# Altium PCB Thunderscope_Rev5.3.PcbDoc (part 8 of 14)
Units mil, origin at the board's own origin, x right, y up, seen from the top; angles counter-clockwise.
Board outline 3937.01 x 3838.58 mil, 6 copper layers (F.Cu, In1.Cu (GND), In2.Cu (Sign), In3.Cu (Sign), In4.Cu (GND), B.Cu), stack 60.556 mil thick; 911 components, 486 nets, 2834 pads, 2761 vias.
Unrouted connection lines stored in the file: 618.
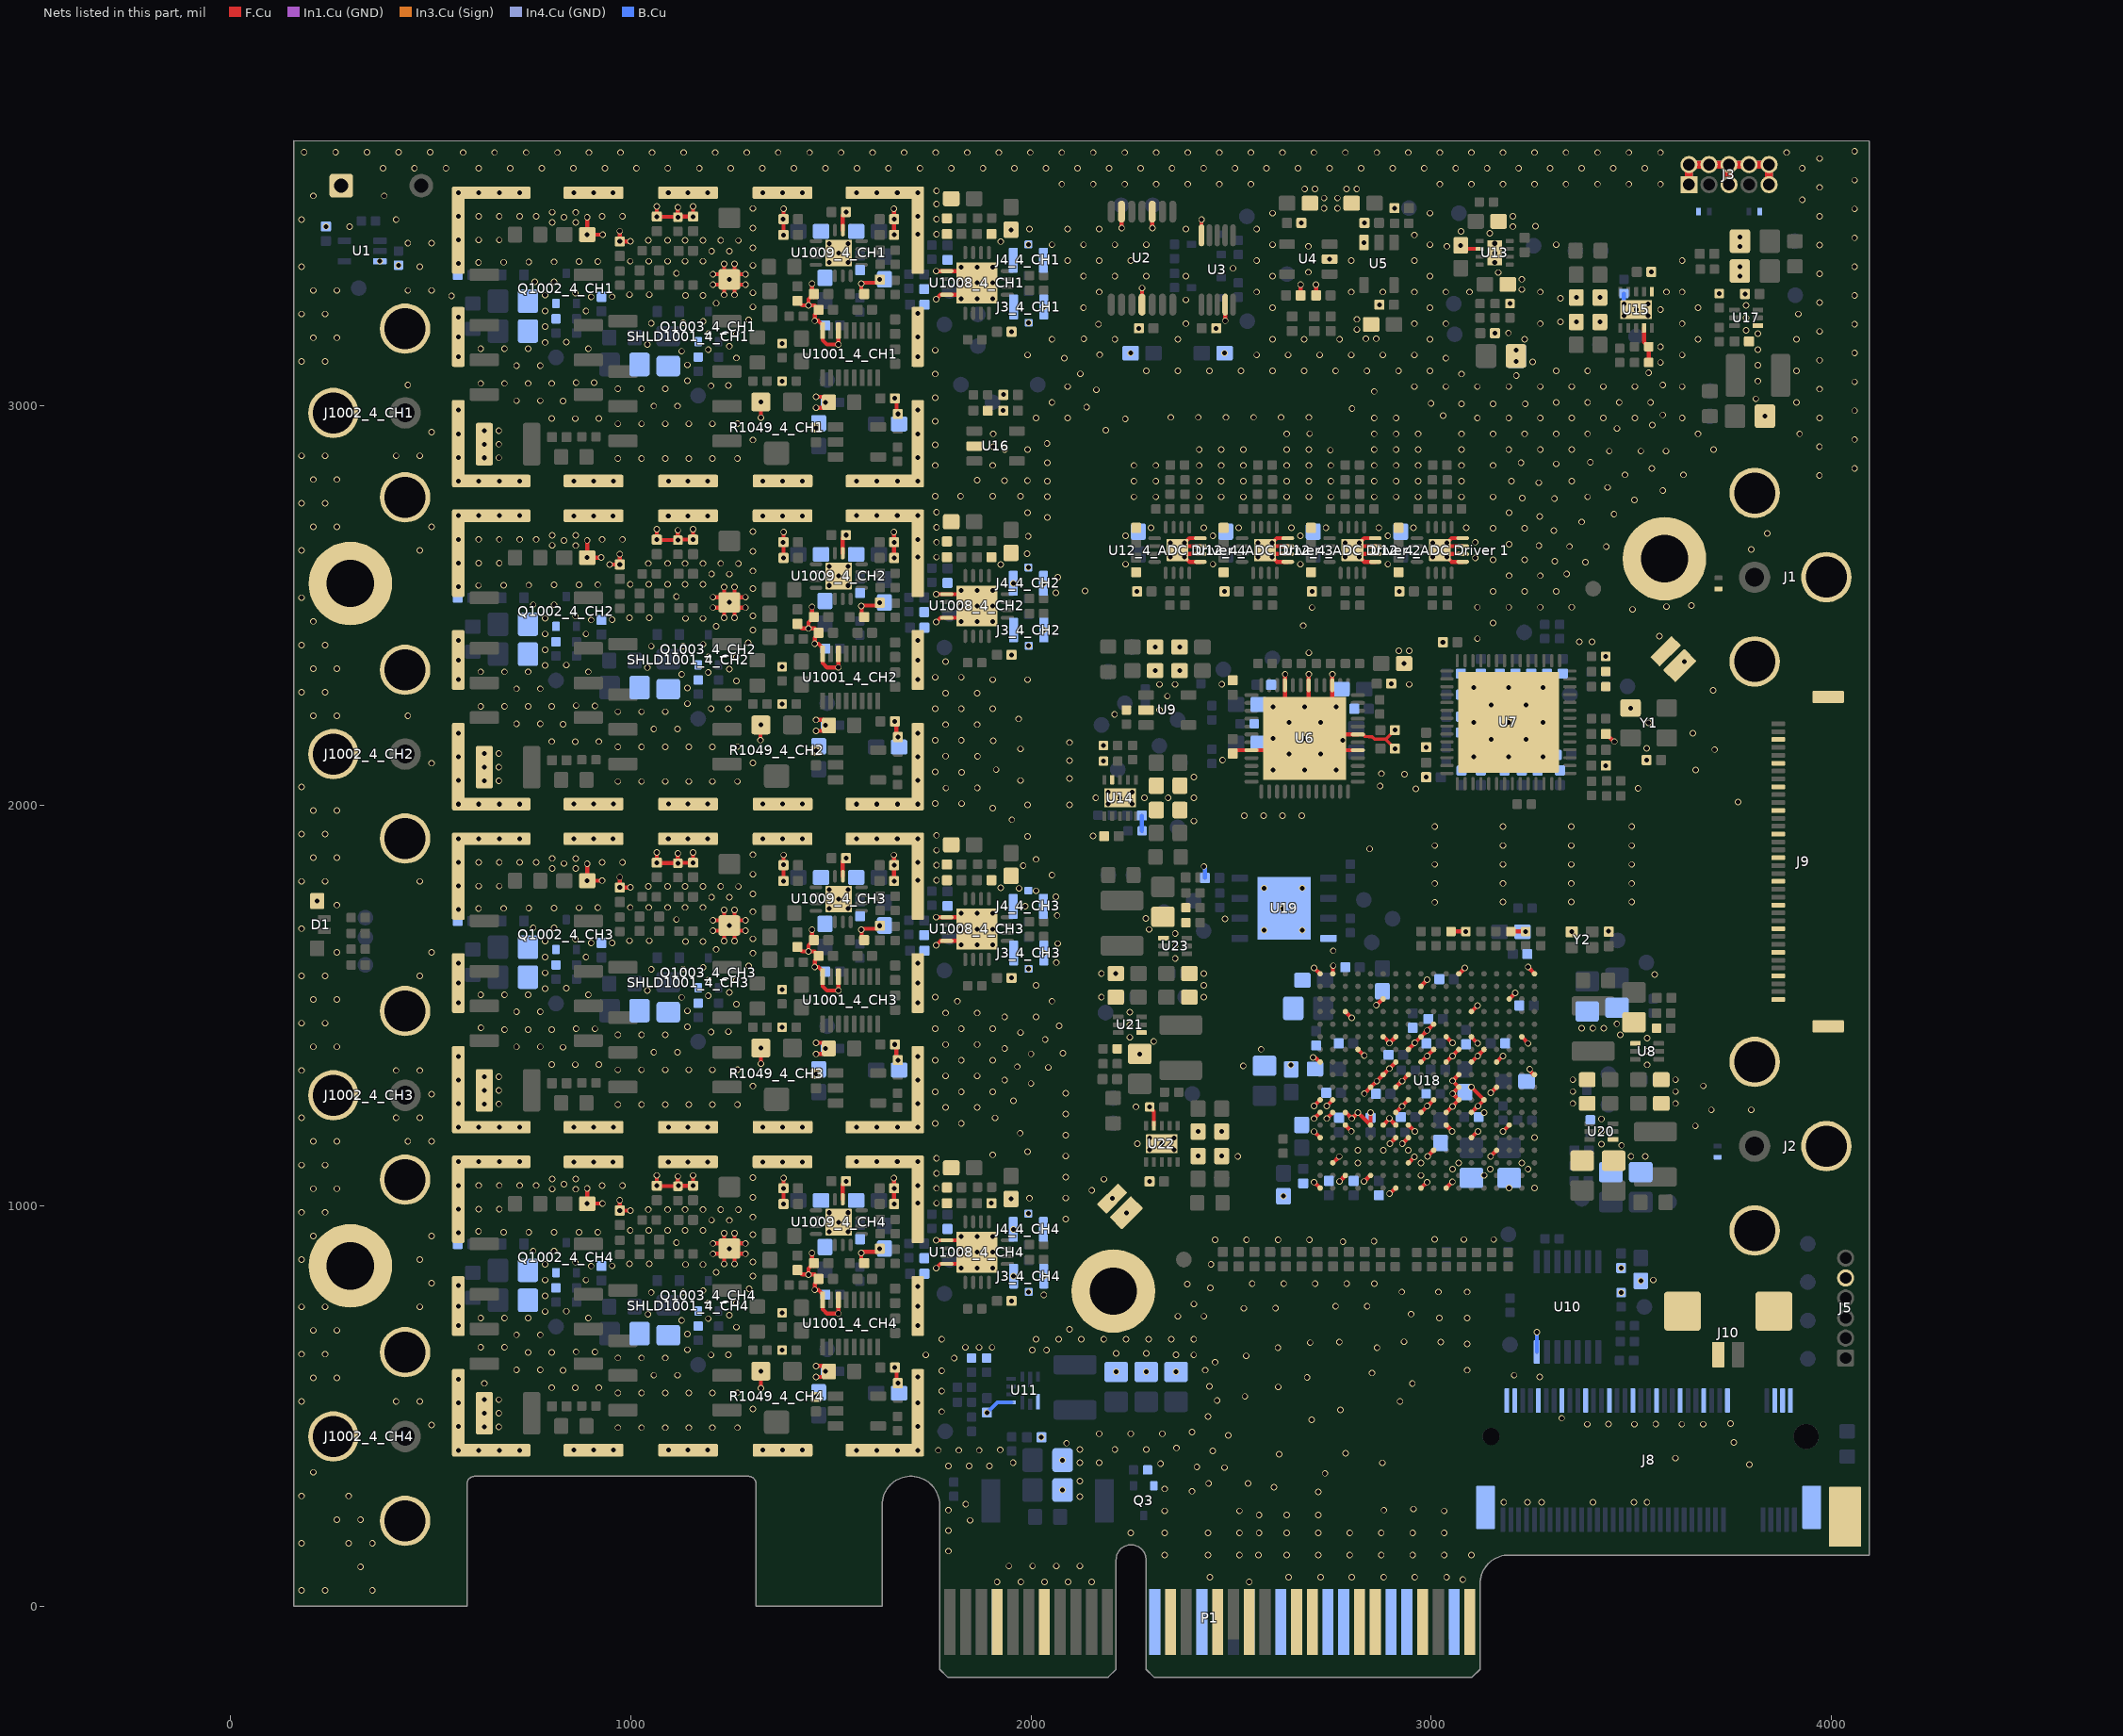
[diagram p11: the nets of this part, all layers, seen from the top]

## Via types
v1: diameter 16, hole 11.81, F.Cu to B.Cu, tented both sides, 2761 vias

## Nets (pads, with @x,y where several pads share a name; then routed paths per layer and width w, separated by ;. In a path a pad name is that pad's centre, name@x,y a point inside that pad or via, vN(x,y) a via of type N, cw(c..) or ccw(c..) an arc to the next point about the centre after c; other vN are vias at no path point) (continued)
GND: "C69_4_ADC Driver 1.1" "C69_4_ADC Driver 2.1" "C69_4_ADC Driver 3.1" "C69_4_ADC Driver 4.1" "C70_4_ADC Driver 1.2" "C70_4_ADC Driver 2.2" "C70_4_ADC Driver 3.2" "C70_4_ADC Driver 4.2" "C104_4_ADC Driver 1.2" "C104_4_ADC Driver 2.2" "C104_4_ADC Driver 3.2" "C104_4_ADC Driver 4.2" "C105_4_ADC Driver 1.2" "C105_4_ADC Driver 2.2" "C105_4_ADC Driver 3.2" "C105_4_ADC Driver 4.2" "U12_4_ADC Driver 1.13" "U12_4_ADC Driver 1.14" "U12_4_ADC Driver 1.15" "U12_4_ADC Driver 1.16" "U12_4_ADC Driver 1.17" "U12_4_ADC Driver 2.13" "U12_4_ADC Driver 2.14" "U12_4_ADC Driver 2.15" "U12_4_ADC Driver 2.16" "U12_4_ADC Driver 2.17" "U12_4_ADC Driver 3.13" "U12_4_ADC Driver 3.14" "U12_4_ADC Driver 3.15" "U12_4_ADC Driver 3.16" "U12_4_ADC Driver 3.17" "U12_4_ADC Driver 4.13" "U12_4_ADC Driver 4.14" "U12_4_ADC Driver 4.15" "U12_4_ADC Driver 4.16" "U12_4_ADC Driver 4.17" C1.2 C2.2 C3.2 C5.2 C6.2 C7.2 C8.2 C9.1 C10.1 C11.1 C12.1 C13.1 C14.1 C15.1 C16.2 C17.2 C18.2 C19.2 C20.1 C21.1 C22.1 C23.1 C24.2 C25.2 C26.1 C27.1 C48.2 C49.2 C50.2 C51.2 C52.2 C53.2 C54.2 C55.2 C56.2 C57.2 C58.2 C59.2 C60.2 C61.2 C62.2 C63.2 C65.1 C67.2 C68.2 C71.1 C72.1 C73.1 C75.1 C76.2 C77.1 C78.2 C79.1 C80.1 C81.1 C82.1 C83.1 C84.1 C85.1 C86.1 C87.1 C88.2 C89.2 C90.2 C91.2 C92.2 C93.2 C94.1 C95.1 C96.1 C97.1 C98.1 C99.1 C101.1 C102.2 C103.2 C106.1 C107.1 C108.1 C109.1 C110.1 C111.1 C114.1 C115.1 C116.1 C117.1 C118.1 C119.1 C120.1 C121.1 C122.1 C123.1 C124.1 C125.2 C126.2 C127.2 C128.1 C129.1 C130.2 C138.2 C139.2 C140.2 C141.2 C142.1 C143.1 C144.1 C145.1 C146.1 C147.1 C148.2 C149.2 C150.2 C151.2 C152.1 C153.1 C154.2 C155.2 C156.2 C157.2 C158.1 C159.1 C160.1 C161.1 C162.1 C163.1 C164.2 C165.2 C166.2 C168.1 C169.1 C170.1 C171.1 C172.1 C173.1 C175.1 C176.1 C177.1 C179.1 C180.1 C181.1 C182.1 C183.1 C184.1 C185.1 C187.1 C188.1 C189.1 C190.1 C191.2 C1003_4_CH1.2 C1003_4_CH2.2 C1003_4_CH3.2 C1003_4_CH4.2 C1004_4_CH1.1 C1004_4_CH2.1 C1004_4_CH3.1 C1004_4_CH4.1 C1005_4_CH1.2 C1005_4_CH2.2 C1005_4_CH3.2 C1005_4_CH4.2 C1006_4_CH1.1 C1006_4_CH2.1 C1006_4_CH3.1 C1006_4_CH4.1 C1007_4_CH1.2 C1007_4_CH2.2 C1007_4_CH3.2 C1007_4_CH4.2 C1008_4_CH1.1 C1008_4_CH2.1 C1008_4_CH3.1 C1008_4_CH4.1 C1009_4_CH1.2 C1009_4_CH2.2 C1009_4_CH3.2 C1009_4_CH4.2 C1010_4_CH1.2 C1010_4_CH2.2 C1010_4_CH3.2 C1010_4_CH4.2 C1011_4_CH1.1 C1011_4_CH2.1 C1011_4_CH3.1 C1011_4_CH4.1 C1021_4_CH1.1 C1021_4_CH2.1 C1021_4_CH3.1 C1021_4_CH4.1 C1022_4_CH1.1 C1022_4_CH2.1 C1022_4_CH3.1 C1022_4_CH4.1 C1025_4_CH1.1 C1025_4_CH2.1 C1025_4_CH3.1 C1025_4_CH4.1 C1026_4_CH1.1 C1026_4_CH2.1 C1026_4_CH3.1 C1026_4_CH4.1 C1027_4_CH1.1 C1027_4_CH2.1 C1027_4_CH3.1 C1027_4_CH4.1 C1028_4_CH1.1 C1028_4_CH2.1 C1028_4_CH3.1 C1028_4_CH4.1 C1029_4_CH1.1 C1029_4_CH2.1 C1029_4_CH3.1 C1029_4_CH4.1 C1032_4_CH1.1 C1032_4_CH2.1 C1032_4_CH3.1 C1032_4_CH4.1 C1033_4_CH1.1 C1033_4_CH2.1 C1033_4_CH3.1 C1033_4_CH4.1 C1034_4_CH1.1 C1034_4_CH2.1 C1034_4_CH3.1 C1034_4_CH4.1 C1036_4_CH1.2 C1036_4_CH2.2 C1036_4_CH3.2 C1036_4_CH4.2 C1037_4_CH1.2 C1037_4_CH2.2 C1037_4_CH3.2 C1037_4_CH4.2 C1038_4_CH1.2 C1038_4_CH2.2 C1038_4_CH3.2 C1038_4_CH4.2 C1039_4_CH1.1 C1039_4_CH2.1 C1039_4_CH3.1 C1039_4_CH4.1 C1040_4_CH1.1 C1040_4_CH2.1 C1040_4_CH3.1 C1040_4_CH4.1 C1041_4_CH1.1 C1041_4_CH2.1 C1041_4_CH3.1 C1041_4_CH4.1 C1042_4_CH1.1 C1042_4_CH2.1 C1042_4_CH3.1 C1042_4_CH4.1 C1043_4_CH1.2 C1043_4_CH2.2 C1043_4_CH3.2 C1043_4_CH4.2 C1044_4_CH1.2 C1044_4_CH2.2 C1044_4_CH3.2 C1044_4_CH4.2 C1045_4_CH1.2 C1045_4_CH2.2 C1045_4_CH3.2 C1045_4_CH4.2 C1046_4_CH1.2 C1046_4_CH2.2 C1046_4_CH3.2 C1046_4_CH4.2 C1047_4_CH1.2 C1047_4_CH2.2 C1047_4_CH3.2 C1047_4_CH4.2 C1048_4_CH1.2 C1048_4_CH2.2 C1048_4_CH3.2 C1048_4_CH4.2 C1049_4_CH1.2 C1049_4_CH2.2 C1049_4_CH3.2 C1049_4_CH4.2 C1050_4_CH1.2 C1050_4_CH2.2 C1050_4_CH3.2 C1050_4_CH4.2 C1052_4_CH1.1 C1052_4_CH2.1 C1052_4_CH3.1 C1052_4_CH4.1 C1053_4_CH1.1 C1053_4_CH2.1 C1053_4_CH3.1 C1053_4_CH4.1 C1054_4_CH1.1 C1054_4_CH2.1 C1054_4_CH3.1 C1054_4_CH4.1 C1055_4_CH1.1 C1055_4_CH2.1 C1055_4_CH3.1 C1055_4_CH4.1 C1056_4_CH1.1 C1056_4_CH2.1 C1056_4_CH3.1 C1056_4_CH4.1 C1057_4_CH1.1 C1057_4_CH2.1 C1057_4_CH3.1 C1057_4_CH4.1 C1059_4_CH1.2 C1059_4_CH2.2 C1059_4_CH3.2 C1059_4_CH4.2 D1.2 D2.2 D3.2 D4.2 D5.2 EMI1.1 EMI2.1 FB11.2 J1.2 J2.2 J3.1 J3.2 J3.4 J3.5 J3.6 J3.8 J3.9 J3.10 J3_4_CH1.2 J3_4_CH2.2 J3_4_CH3.2 J3_4_CH4.2 J4.1 J4_4_CH1.2 J4_4_CH2.2 J4_4_CH3.2 J4_4_CH4.2 J5.5 J8.2 J8.4 J8.10 J8.16 J8.22 J8.28 J8.34 J8.40 J8.46 J8.52 J8.58 J8.70 J8.72 J8.74 J8.76 J8.77 J9.1 J9.4 J9.7 J9.10 J9.13 J9.16 J9.19 J9.22 J9.25 J9.28 J9.31 J9.34 J9.SH1 J9.SH2 J10.2 J10.3 J10.4 J1002_4_CH1.2 J1002_4_CH2.2 J1002_4_CH3.2 J1002_4_CH4.2 P1.A4 P1.A12 P1.A15 P1.A18 P1.A20 P1.A23 P1.A24 P1.A27 P1.A28 P1.A31 P1.B4 P1.B7 P1.B13 P1.B16 P1.B18 P1.B21 P1.B22 P1.B25 P1.B26 P1.B29 P1.B32 Q3.3 Q1002_4_CH1.3 Q1002_4_CH2.3 Q1002_4_CH3.3 Q1002_4_CH4.3 Q1003_4_CH1.3 Q1003_4_CH2.3 Q1003_4_CH3.3 Q1003_4_CH4.3 R8.2 R17.2 R48.1 R49.1 R52.1 R56.1 R62.2 R70.1 R74.2 R76.1 R78.1 R80.1 R81.1 R86.2 R88.2 R94.2 R96.1 R102.1 R103.1 R104.1 R105.1 R108.2 R110.2 R111.2 R119.2 R124.1 R127.2 R130.2 R1003_4_CH1.2 R1003_4_CH2.2 R1003_4_CH3.2 R1003_4_CH4.2 R1025_4_CH1.1 R1025_4_CH2.1 R1025_4_CH3.1 R1025_4_CH4.1 R1026_4_CH1.1 R1026_4_CH2.1 R1026_4_CH3.1 R1026_4_CH4.1 R1031_4_CH1.2 R1031_4_CH2.2 R1031_4_CH3.2 R1031_4_CH4.2 R1032_4_CH1.2 R1032_4_CH2.2 R1032_4_CH3.2 R1032_4_CH4.2 R1047_4_CH1.2 R1047_4_CH2.2 R1047_4_CH3.2 R1047_4_CH4.2 R1048_4_CH1.1 R1048_4_CH2.1 R1048_4_CH3.1 R1048_4_CH4.1 R1049_4_CH1.3 R1049_4_CH2.3 R1049_4_CH3.3 R1049_4_CH4.3 R1052_4_CH1.2 R1052_4_CH2.2 R1052_4_CH3.2 R1052_4_CH4.2 SHLD1001_4_CH1.1 SHLD1001_4_CH2.1 SHLD1001_4_CH3.1 SHLD1001_4_CH4.1 SO1.1 SO2.1 SO3.1 SO4.1 TP2.1 U1.3 U2.3 U2.6 U2.11 U3.4 U3.10 U4.2 U5.3 U6.8 U6.29 U6.31 U6.39 U6.42 U6.45 U6.49 U7.57 U8.1 U9.2 U10.7 U11.4 U11.7 U13.2 U13.9 U14.4 U14.11 U15.4 U15.6 U15.11 U16.2 U17.4 U18.A1 U18.A5 U18.A7 U18.A8 U18.A11 U18.A18 U18.B3 U18.B7 U18.B8 U18.B18 U18.C2 U18.C6 U18.C7 U18.C15 U18.D3 U18.D4 U18.D7 U18.D12 U18.E2 U18.E6 U18.E7 U18.E9 U18.F4 U18.F6 U18.F10 U18.F13 U18.F16 U18.G1 U18.G5 U18.G6 U18.G7 U18.G9 U18.G11 U18.G13 U18.H3 U18.H4 U18.H5 U18.H6 U18.H8 U18.H10 U18.H12 U18.J1 U18.J2 U18.J3 U18.J7 U18.J11 U18.J13 U18.J17 U18.K4 U18.K8 U18.K12 U18.K14 U18.L1 U18.L6 U18.L7 U18.L11 U18.L13 U18.M3 U18.M8 U18.M9 U18.M10 U18.M12 U18.M18 U18.N5 U18.N7 U18.N9 U18.N11 U18.N13 U18.N15 U18.P2 U18.P7 U18.P8 U18.P12 U18.R4 U18.R9 U18.R11 U18.T1 U18.T6 U18.T16 U18.U3 U18.U13 U18.V1 U18.V5 U18.V10 U18.V18 U19.4 U19.9 U20.1 U21.1 U22.4 U22.11 U23.1 U1001_4_CH1.6 U1001_4_CH1.8 U1001_4_CH2.6 U1001_4_CH2.8 U1001_4_CH3.6 U1001_4_CH3.8 U1001_4_CH4.6 U1001_4_CH4.8 U1008_4_CH1.5 U1008_4_CH1.8 U1008_4_CH1.17 U1008_4_CH2.5 U1008_4_CH2.8 U1008_4_CH2.17 U1008_4_CH3.5 U1008_4_CH3.8 U1008_4_CH3.17 U1008_4_CH4.5 U1008_4_CH4.8 U1008_4_CH4.17 U1009_4_CH1.14 U1009_4_CH1.17 U1009_4_CH2.14 U1009_4_CH2.17 U1009_4_CH3.14 U1009_4_CH3.17 U1009_4_CH4.14 U1009_4_CH4.17 Y1.2 Y2.2 | length 11674
  F.Cu w8: U6.29@2804.25,2138.78 U6.29@2816.66,2138.78 ; U6.31@2816.66,2178.15 2829.95,2178.15 2835.21,2172.89 2851.72,2172.89 2858.27,2166.34 ; 2843.97,2172.46 2852.14,2172.46 2858.27,2166.34 ; 2869.1,2166.34 2858.27,2166.34 ; 2887.82,2164.04 v1(2909.14,2142.72) ; v1(2909.14,2188.98) 2886.5,2166.34 2858.27,2166.34
  F.Cu w9.84: v1(1380.79,2658.46) 1381.89,2659.56 v1(1381.89,2684.06) ; v1(1380.79,3465.55) 1381.89,3466.65 v1(1381.89,3491.14) ; v1(1381.5,1044.29) 1381.69,1044.49 1381.69,1069.69 v1(1381.89,1069.88) ; v1(1381.89,1852.47) v1(1381.89,1876.97) ; v1(1452.76,882.87) 1452.76,862.6 C1052_4_CH4.1@1457.68,857.68 ; v1(1452.76,1689.96) 1452.76,1669.69 C1052_4_CH3.1@1457.68,1664.76 ; v1(1452.76,2497.05) 1452.76,2476.77 C1052_4_CH2.1@1457.68,2471.85 ; v1(1452.76,3304.13) 1452.76,3283.07 1456.89,3278.94 C1052_4_CH1.1@1457.68,3278.94 ; C1052_4_CH4.1@1457.28,849.41 C1052_4_CH4.1@1457.68,849.8 ; C1052_4_CH3.1@1457.28,1656.5 C1052_4_CH3.1@1457.68,1656.89 ; C1052_4_CH2.1@1457.28,2463.58 C1052_4_CH2.1@1457.68,2463.98 ; C1052_4_CH1.1@1457.28,3270.67 C1052_4_CH1.1@1457.68,3271.06 ; v1(1575.79,882.87) 1575.79,864.57 1582.68,857.68 C1056_4_CH4.1@1583.46,857.68 ; v1(1575.79,3304.13) 1575.79,3285.83 1582.68,3278.94 C1056_4_CH1.1@1583.46,3278.94 ; C1032_4_CH4.1@1621.65,893.5 v1(1622.05,893.11) ; C1032_4_CH3.1@1621.65,1700.59 v1(1622.05,1700.2) ; C1032_4_CH2.1@1621.65,2507.68 v1(1622.05,2507.28) ; C1032_4_CH1.1@1621.65,3314.76 v1(1622.05,3314.37) ; v1(1657.48,1069.88) 1657.48,1045.39 v1(1658.58,1044.29) ; v1(1657.48,1876.97) 1657.48,1852.48 1658.58,1851.38 v1(1657.87,1851.38) ; v1(1657.48,2684.06) 1657.48,2659.56 v1(1658.58,2658.47) ; v1(1657.48,3491.14) 1657.48,3466.65 1658.58,3465.55 v1(1657.87,3465.55) ; v1(1762.8,844.49) 1773.62,855.31 U1008_4_CH4.8@1789.37,855.31 U1008_4_CH4.17@1835.63,855.31 ; v1(1762.8,1651.57) 1773.62,1662.4 U1008_4_CH3.8@1789.37,1662.4 U1008_4_CH3.17@1835.63,1662.4 ; v1(1762.8,2458.66) 1773.62,2469.49 U1008_4_CH2.8@1789.37,2469.49 U1008_4_CH2.17@1835.63,2469.49 ; v1(1762.8,3265.75) 1773.62,3276.57 U1008_4_CH1.8@1789.37,3276.57 U1008_4_CH1.17@1835.63,3276.57 ; v1@1764.76,914.37 U1008_4_CH4.17@1835.63,914.37 ; v1@1764.76,1721.46 U1008_4_CH3.17@1835.63,1721.46 ; v1@1764.76,2528.54 U1008_4_CH2.17@1835.63,2528.54 ; v1@1764.76,3335.63 U1008_4_CH1.5@1789.37,3335.63 U1008_4_CH1.17@1835.63,3335.63
  F.Cu w10: C1022_4_CH4.1@891,1005.74 v1(891,1044) ; v1(891,1855) 891,1812.8 v1(891.09,1812.72) 891.23,1812.86 927.86,1812.86 v1(928,1813) ; v1(891,2663) 891,2619.89 v1(891.09,2619.8) 891.18,2619.9 925.9,2619.9 v1(926,2620) ; v1(891,3470) 891,3426.98 v1(891.09,3426.89) 891.14,3426.95 v1(930,3427) v1(930,3427) ; C1022_4_CH4.1@891.44,1006 v1(929,1006) ; v1@947.05,2602.76 v1(972.44,2602.76) v1(972.44,2628.54) ; v1(972.44,1014.37) v1(972.44,988.58) v1@998.62,988.58 ; v1(972.44,1821.46) v1(972.44,1795.67) v1@998.62,1795.67 ; v1(972.44,3435.63) v1(972.44,3409.84) v1@998.62,3409.84 ; v1(1064.96,1076.38) v1(1064.96,1050.59) 1065.65,1049.9 1116.63,1049.9 R1026_4_CH4.1@1117.32,1049.21 v1(1117.32,1074.02) ; v1(1064.96,1883.46) v1(1064.96,1857.68) 1065.65,1856.99 1116.63,1856.99 v1(1117.32,1856.3) ; v1(1064.96,2690.55) v1(1064.96,2664.76) 1065.65,2664.07 1116.63,2664.07 v1(1117.32,2663.39) ; v1(1064.96,3497.64) v1(1064.96,3471.85) 1065.65,3471.16 1116.63,3471.16 v1(1117.32,3470.47) ; v1(1117.32,1881.1) v1(1117.32,1856.3) ; v1(1117.32,2688.19) v1(1117.32,2663.39) ; v1(1117.32,3495.28) v1(1117.32,3470.47) ; v1(1118.7,1050.59) v1(1155.51,1050.59) v1(1155.51,1076.38) ; v1(1155.51,1883.46) v1(1155.51,1857.68) 1118.7,1857.68 v1(1117.32,1856.3) ; v1(1155.51,2690.55) v1(1155.51,2664.76) 1118.7,2664.76 v1(1117.32,2663.39) ; v1(1155.51,3497.64) v1(1155.51,3471.85) 1118.7,3471.85 v1(1117.32,3470.47) ; v1@1206.69,880.71 C1059_4_CH4.2@1230.71,880.71 ; v1@1206.69,906.69 C1059_4_CH4.2@1230.71,906.69 ; v1@1206.69,1687.8 C1059_4_CH3.2@1230.71,1687.8 ; v1@1206.69,1713.78 C1059_4_CH3.2@1230.71,1713.78 ; v1@1206.69,2494.88 C1059_4_CH2.2@1230.71,2494.88 ; v1@1206.69,2520.87 C1059_4_CH2.2@1230.71,2520.87 ; v1@1206.69,3301.97 C1059_4_CH1.2@1230.71,3301.97 ; v1@1206.69,3327.95 C1059_4_CH1.2@1230.71,3327.95 ; v1(1233.07,855.12) C1059_4_CH4.2@1233.07,879.13 ; C1059_4_CH4.2@1233.07,908.27 v1(1233.07,932.28) ; v1(1233.07,1662.2) C1059_4_CH3.2@1233.07,1686.22 ; C1059_4_CH3.2@1233.07,1715.35 v1(1233.07,1739.37) ; v1(1233.07,2469.29) C1059_4_CH2.2@1233.07,2493.31 ; C1059_4_CH2.2@1233.07,2522.44 v1(1233.07,2546.46) ; v1(1233.07,3276.38) C1059_4_CH1.2@1233.07,3300.39 ; C1059_4_CH1.2@1233.07,3329.53 v1(1233.07,3353.54) ; C1059_4_CH4.2@1233.86,908.27 1233.86,905.91 v1(1246.06,893.7) ; C1059_4_CH3.2@1233.86,1715.35 1233.86,1712.99 v1(1246.06,1700.79) ; C1059_4_CH2.2@1233.86,2522.44 1233.86,2520.08 v1(1246.06,2507.87) ; C1059_4_CH1.2@1233.86,3329.53 1233.86,3327.17 v1(1246.06,3314.96) ; v1(1259.06,855.12) C1059_4_CH4.2@1259.06,879.13 ; C1059_4_CH4.2@1259.06,908.27 v1(1259.06,932.28) ; v1(1259.06,1662.2) C1059_4_CH3.2@1259.06,1686.22 ; C1059_4_CH3.2@1259.06,1715.35 v1(1259.06,1739.37) ; v1(1259.06,2469.29) C1059_4_CH2.2@1259.06,2493.31 ; C1059_4_CH2.2@1259.06,2522.44 v1(1259.06,2546.46) ; v1(1259.06,3276.38) C1059_4_CH1.2@1259.06,3300.39 ; C1059_4_CH1.2@1259.06,3329.53 v1(1259.06,3353.54) ; C1059_4_CH4.2@1261.42,880.71 v1@1285.43,880.71 ; C1059_4_CH4.2@1261.42,906.69 v1@1285.43,906.69 ; C1059_4_CH3.2@1261.42,1687.8 v1@1285.43,1687.8 ; C1059_4_CH3.2@1261.42,1713.78 v1@1285.43,1713.78 ; C1059_4_CH2.2@1261.42,2494.88 v1@1285.43,2494.88 ; C1059_4_CH2.2@1261.42,2520.87 v1@1285.43,2520.87 ; C1059_4_CH1.2@1261.42,3301.97 v1@1285.43,3301.97 ; C1059_4_CH1.2@1261.42,3327.95 v1@1285.43,3327.95 ; v1(1324,2164) 1324,2200.97 v1(1324.8,2201.77) ; v1(1324.8,587.6) 1325,587.4 v1(1325,545) ; v1(1324.8,1355.31) v1(1324.8,1394.69) ; v1(1324.8,2969.49) v1(1324.8,3008.86) ; v1(1380.79,2658.46) C1044_4_CH2.2@1381.5,2658.46 C1047_4_CH2.2@1381.5,2619.09 ; v1(1380.79,3465.55) C1044_4_CH1.2@1381.5,3465.55 C1047_4_CH1.2@1381.5,3426.18 ; v1(1381.21,2618.81) C1047_4_CH2.2@1382.2,2619.8 ; v1(1381.21,3425.9) C1047_4_CH1.2@1382.2,3426.88 ; v1(1381.5,1004.92) v1(1381.5,1044.29) ; v1(1381.5,1812.01) C1044_4_CH3.2@1381.5,1851.38 1381.89,1851.77 v1(1381.89,1852.47) ; C1034_4_CH4.1@1416.34,840.16 1427.76,828.74 v1(1443.9,828.74) ; C1034_4_CH3.1@1416.34,1647.24 1427.76,1635.83 v1(1443.9,1635.83) ; C1034_4_CH2.1@1416.34,2454.33 1427.76,2442.91 v1(1443.9,2442.91) ; C1034_4_CH1.1@1416.34,3261.42 1427.76,3250 v1(1443.9,3250) ; C1052_4_CH4.1@1457.28,857.28 1443.9,843.9 v1(1443.9,828.74) ; C1052_4_CH3.1@1457.28,1664.37 1443.9,1650.98 v1(1443.9,1635.83) ; C1052_4_CH2.1@1457.28,2471.46 1443.9,2458.07 v1(1443.9,2442.91) ; C1052_4_CH1.1@1457.28,3278.54 1443.9,3265.16 v1(1443.9,3250) ; v1(1462.6,572.83) 1481.3,572.83 R1003_4_CH4.2@1495.08,586.61 1481.3,600.39 v1(1462.6,600.39) ; v1(1462.6,1379.92) 1481.3,1379.92 R1003_4_CH3.2@1495.08,1393.7 1481.3,1407.48 v1(1462.6,1407.48) ; v1(1462.6,2187.01) 1481.3,2187.01 R1003_4_CH2.2@1495.08,2200.79 1481.3,2214.57 v1(1462.6,2214.57) ; v1(1462.6,2994.09) 1481.3,2994.09 R1003_4_CH1.2@1495.08,3007.87 1481.3,3021.65 v1(1462.6,3021.65) ; U1001_4_CH4.6@1518.7,765.75 v1(1518.7,731.3) 1490.16,731.3 1479.33,742.13 1479.33,779.53 1468.5,790.35 v1(1459.65,790.35) 1459.65,805.51 1471.06,816.93 1459.25,828.74 v1(1443.9,828.74) ; U1001_4_CH3.6@1518.7,1572.83 v1(1518.7,1538.39) 1490.16,1538.39 1479.33,1549.21 U1001_4_CH3.8@1479.33,1572.83 1479.33,1586.61 1468.5,1597.44 v1(1459.65,1597.44) 1459.65,1612.6 1471.06,1624.02 1459.25,1635.83 v1(1443.9,1635.83) ; U1001_4_CH2.6@1518.7,2379.92 v1(1518.7,2345.47) 1490.16,2345.47 1479.33,2356.3 U1001_4_CH2.8@1479.33,2379.92 1479.33,2393.7 1468.5,2404.53 v1(1459.65,2404.53) 1459.65,2419.69 1471.06,2431.1 1459.25,2442.91 v1(1443.9,2442.91) ; U1001_4_CH1.6@1518.7,3187.01 v1(1518.7,3152.56) 1490.16,3152.56 1479.33,3163.39 U1001_4_CH1.8@1479.33,3187.01 1479.33,3200.79 1468.5,3211.61 v1(1459.65,3211.61) 1459.65,3226.77 1471.06,3238.19 1459.25,3250 v1(1443.9,3250) ; U1009_4_CH4.14@1529.53,1016.73 1529.53,1053.94 v1(1537.6,1062.01) ; U1009_4_CH3.14@1529.53,1823.82 1529.53,1861.02 v1(1537.6,1869.09) ; U1009_4_CH2.14@1529.53,2630.91 1529.53,2668.11 v1(1537.6,2676.18) ; U1009_4_CH1.14@1529.53,3437.99 1529.53,3475.2 v1(1537.6,3483.27) ; v1(1575.79,882.87) 1577.41,882.87 1580.05,885.51 1614.45,885.51 v1(1622.05,893.11) ; v1(1575.79,3304.13) 1577.41,3304.13 1580.05,3306.77 1614.45,3306.77 v1(1622.05,3314.37) ; C1056_4_CH3.1@1583.07,1664.37 1577.15,1670.29 1577.15,1688.85 v1(1576,1690) 1577.62,1690 1580.22,1692.6 1614.45,1692.6 v1(1622.05,1700.2) ; C1056_4_CH2.1@1583.07,2471.46 1577.15,2477.38 1577.15,2497.85 v1(1576,2499) 1577.15,2500.15 1614.91,2500.15 v1(1622.05,2507.28) ; v1(1657.87,1851.38) v1(1657.87,1812.01) C1049_4_CH3.2@1658.15,1811.73 ; v1(1657.87,3465.55) v1(1657.87,3426.18) C1049_4_CH1.2@1658.15,3425.9 ; C1049_4_CH4.2@1658.16,1004.64 v1(1657.87,1004.92) C1046_4_CH4.2@1657.87,1044.29 v1(1658.58,1044.29) ; C1049_4_CH2.2@1658.15,2618.81 v1(1657.87,2619.09) C1046_4_CH2.2@1657.87,2658.47 v1(1658.58,2658.47) ; v1(1659.84,596.46) 1664.37,591.93 1664.37,560.43 v1(1667.32,557.48) ; v1(1659.84,1403.54) 1663.58,1399.8 1663.58,1368.31 v1(1667.32,1364.57) ; v1(1659.84,2210.63) 1664.37,2206.1 1663.58,2205.32 1663.58,2175.39 v1(1667.32,2171.65) ; v1(1659.84,3017.72) 1664.37,3013.19 1664.37,2981.69 v1(1667.32,2978.74) ; v1(1900.98,1006.89) C1037_4_CH4.2@1901.69,1006.89 ; C1037_4_CH3.2@1900.98,1813.98 C1037_4_CH3.2@1901.69,1813.98 ; C1037_4_CH2.2@1900.98,2621.06 C1037_4_CH2.2@1901.69,2621.06 ; C1037_4_CH1.2@1900.98,3428.15 C1037_4_CH1.2@1901.69,3428.15 ; C1043_4_CH4.2@1950.98,762.6 v1(1951.18,762.8) ; C1043_4_CH3.2@1950.98,1569.69 v1(1951.18,1569.88) ; C1043_4_CH2.2@1950.98,2376.77 v1(1951.18,2376.97) ; C1043_4_CH1.2@1950.98,3183.86 v1(1951.18,3184.06) ; U2.6@2226.18,3484.25 2226.18,3443.11 v1(2226.38,3442.91) ; U2.11@2277.36,3251.97 2277.36,3293.11 v1(2277.56,3293.31) ; v1(2296.46,1247.05) 2307.09,1236.42 U22.4@2307.09,1200.79 ; U2.3@2302.95,3484.25 2302.95,3443.11 v1(2303.15,3442.91) ; v1@2361.42,1679.92 v1@2362.2,1679.92 ; 2423.09,2609.25 2395.53,2609.25 v1(2383.72,2621.06) 2391.6,2628.94 2423.09,2628.94 ; 2423.09,2648.62 2391.6,2648.62 v1(2383.72,2656.5) 2395.53,2668.31 2423.09,2668.31 ; U3.10@2425.98,3425.2 2425.98,3464.37 v1(2426.18,3464.57) ; U3.4@2485.04,3251.97 2485.04,3211.81 v1(2485.24,3211.61) ; C18.2@2503.94,2130.51 2512.2,2138.78 2654.25,2138.78 v1(2683.78,2168.31) ; v1(2634.84,2328.74) 2634.57,2328.47 U6.45@2634.57,2301.18 2634.57,2217.52 v1(2683.78,2168.31) ; 2641.6,2609.25 2614.04,2609.25 v1(2602.23,2621.06) 2610.1,2628.94 2641.6,2628.94 ; 2641.6,2648.62 2610.1,2648.62 v1(2602.23,2656.5) 2614.04,2668.31 2641.6,2668.31 ; C6.2@2673.62,3275 v1(2673.62,3302.17) ; v1(2693.9,2328.74) 2693.62,2328.47 U6.42@2693.62,2301.18 U6.49@2693.62,2178.15 ; v1(2704.6,1370.89) 2705.74,1369.74 2711.42,1369.74 2721.42,1359.74 U18.A11@2722.44,1359.74 ; v1(2707.39,1218.6) 2722.36,1233.57 U18.A7@2722.5,1233.62 ; v1(2707.39,1250.09) 2722.36,1265.06 U18.A8@2722.5,1265.12 ; v1(2707.47,1059.75) U18.A1@2722.44,1044.78 U18.A1@2722.5,1044.65 ; v1(2707.47,1185.74) U18.A5@2722.44,1170.77 ; v1(2707.47,1595.19) U18.A18@2722.44,1580.22 U18.A18@2722.5,1580.08 ; C7.2@2712.2,3275 v1(2712.2,3302.17) ; v1(2738.89,1218.6) 2753.86,1233.57 U18.B7@2753.99,1233.62 ; v1(2738.89,1250.09) 2753.86,1265.06 U18.B8@2753.99,1265.12 ; v1(2752.95,2328.74) 2752.68,2328.47 U6.39@2752.68,2301.18 2752.68,2237.2 U6.49@2693.62,2178.15 ; U18.B18@2753.94,1580.22 U18.B18@2753.99,1580.08 ; U18.B3@2754.13,1107.7 2753.99,1107.64 2754.29,1107.64 v1(2770.13,1123.49) ; U18.B18@2754.13,1580.14 U18.B18@2753.99,1580.08 ; v1@2756.95,1599.27 2753.99,1596.32 U18.B18@2753.99,1580.08 ; v1(2770.38,1061.12) U18.C2@2785.35,1076.09 ; U18.C7@2785.35,1233.57 2785.49,1233.62 2786.85,1233.62 v1(2801.88,1218.6) 2816.85,1233.57 2816.99,1233.62 2816.93,1233.68 v1(2816.93,1233.76) 2832.68,1218.01 U18.E6@2848.43,1202.26 v1(2848.43,1233.76) ; U18.C6@2785.49,1202.13 2785.55,1201.99 v1@2800.52,1187.02 ; U18.C15@2785.49,1485.59 2800.74,1470.34 v1(2801.24,1470.34) ; U6.29@2816.66,2138.78 2713.31,2138.78 v1(2683.78,2168.31) ; U6.31@2816.66,2178.15 U6.49@2693.62,2178.15 ; v1(2816.93,1139.27) 2816.93,1139.19 U18.D4@2816.99,1139.14 ; U18.D12@2816.99,1391.1 2817.04,1390.97 2832.01,1376 v1(2832.73,1376) ; v1(2831.74,1061.12) 2832.5,1061.12 2847.47,1076.09 U18.E2@2848.35,1076.09 ; v1@2833.13,1282.94 2834.8,1282.94 U18.E9@2848.48,1296.62 ; U18.E9@2848.62,1296.67 U18.E9@2848.48,1296.62 ; 2860.11,2609.25 2832.55,2609.25 v1(2820.74,2621.06) 2828.61,2628.94 2860.11,2628.94 ; 2860.11,2648.62 2828.61,2648.62 v1(2820.74,2656.5) 2832.55,2668.31 2860.11,2668.31 ; v1(2862.99,1501.6) 2878.48,1517.09 U18.F16@2879.98,1517.09 ; v1(2864.23,1311.87) 2863.74,1311.87 U18.E9@2848.48,1296.62 ; v1@2864.72,1312.86 2879.98,1328.11 2895.73,1343.86 v1@2895.73,1344.35 ; U18.F6@2879.84,1202.07 U18.F6@2879.98,1202.13 ; U18.F13@2879.84,1422.54 2879.98,1422.6 2881.34,1422.6 2895.73,1408.22 v1(2895.73,1406.95) ; U18.F16@2879.84,1517.03 U18.F16@2879.98,1517.09 ; v1(2879.92,1139.27) 2879.92,1139.19 U18.F4@2879.98,1139.14 ; U18.F16@2879.98,1518.57 U18.F16@2879.98,1517.09 ; U18.F6@2881.34,1202.13 U18.F6@2879.98,1202.13 ; v1(2895.73,1218.76) v1@2895.73,1217.88 ; v1(2895.73,1406.95) 2911.34,1422.54 U18.G13@2911.47,1422.6 ; v1(2895.95,1030.78) 2896.68,1030.78 2910.69,1044.78 U18.G1@2911.42,1044.78 ; v1@2896.22,1344.35 2911.47,1359.61 U18.G11@2911.34,1359.55 ; v1(2896.37,1155.61) 2911.34,1170.58 U18.G5@2911.47,1170.63 ; U18.G6@2911.39,1201.94 2911.34,1202.07 2911.47,1202.13 v1@2895.73,1217.88 ; U18.G7@2911.47,1233.62 v1@2926.73,1248.88 ; U18.G9@2911.47,1296.62 v1@2926.73,1311.87 ; v1(2927.22,1311.87) 2927.22,1312.36 2942.97,1328.11 U18.H10@2942.83,1328.06 ; v1(2927.61,1249.08) 2927.61,1249.77 U18.H8@2942.97,1265.12 ; v1(2927.86,1155.61) 2942.83,1170.58 U18.H5@2942.97,1170.63 ; U18.H12@2942.7,1390.99 2958.72,1407.01 v1(2958.72,1407.34) 2959.21,1407.34 U18.J13@2974.47,1422.6 ; U18.H6@2942.83,1202.07 U18.H6@2942.97,1202.13 ; v1(2942.91,1139.27) 2942.91,1139.19 U18.H4@2942.97,1139.14 ; U18.H3@2942.97,1107.64 2943.1,1107.7 v1(2958.07,1122.67) ; U18.H6@2942.97,1202.21 U18.H6@2942.97,1202.13 ; v1@2958.72,1186.38 U18.H6@2942.97,1202.13 ; U18.J1@2974.33,1044.59 2974.47,1044.65 2974.6,1044.7 v1(2989.57,1059.67) ; v1(2974.41,1076.28) 2974.41,1076.2 U18.J2@2974.47,1076.14 ; v1(2974.41,1107.78) 2974.47,1107.72 U18.J3@2974.47,1107.64 ; U18.J7@2974.47,1233.62 v1@2989.72,1248.88 ; U18.J11@2974.47,1359.61 2974.33,1359.55 v1@2989.59,1374.81 ; U18.J17@2974.47,1548.59 2974.47,1549.52 2989.94,1564.99 v1(2989.94,1565.73) ; U18.J13@2974.52,1422.47 U18.J13@2974.47,1422.6 ; C62.2@2986.02,2146.26 v1(2987.2,2146.26) ; v1(2990.08,1374.81) 2990.08,1375.3 3005.83,1391.05 U18.K12@3005.69,1390.99 ; v1@2990.21,1248.88 2990.21,1249.37 U18.K8@3005.96,1265.12 ; v1(2990.72,1124.05) 3005.69,1139.02 U18.K4@3005.83,1139.08 ; U18.K14@3005.96,1454.1 U18.K14@3006.02,1453.96 ; U18.K14@3006.15,1454.02 U18.K14@3006.02,1453.96 ; U18.L6@3037.19,1202.02 U18.L6@3037.32,1202.07 ; U18.L6@3037.4,1202.26 3037.46,1202.13 3050.39,1189.19 3050.39,1188.5 v1(3052.42,1186.48) ; U18.L1@3037.46,1044.75 v1(3052.81,1060.1) ; U18.L7@3037.46,1233.62 v1@3052.71,1248.88 ; U18.L11@3037.46,1359.61 v1@3052.71,1374.86 ; U18.L13@3037.46,1422.6 3052.71,1407.34 v1(3053.21,1407.34) ; R81.1@3049.21,1686.02 v1(3086.61,1686.02) ; v1(3053.21,1248.88) 3053.21,1249.37 3068.95,1265.12 v1@3053.7,1280.38 ; v1(3053.21,1374.86) 3053.21,1375.36 3068.95,1391.1 U18.M12@3068.82,1391.05 ; v1(3053.7,1280.87) 3053.7,1281.36 U18.M9@3068.95,1296.62 ; U18.M10@3068.82,1328.06 3068.95,1328.11 3053.7,1312.86 v1(3053.21,1312.86) 3053.21,1312.36 U18.M9@3068.95,1296.62 ; U18.M3@3068.86,1107.64 3068.9,1107.68 v1(3068.9,1107.78) ; U18.M18@3068.95,1580.08 3069.45,1580.08 3083.73,1594.37 v1(3083.73,1595.12) ; U18.M9@3069.17,1296.62 U18.M9@3068.95,1296.62 ; v1(3073.82,3400) 3082.68,3391.14 U13.2@3121.26,3391.14 ; 3078.61,2609.25 3051.05,2609.25 v1(3039.24,2621.06) 3047.12,2628.94 3078.61,2628.94 ; 3078.61,2648.62 3047.12,2648.62 v1(3039.24,2656.5) 3051.05,2668.31 3078.61,2668.31 ; v1@3084.7,1595.34 v1@3084.7,1595.83 ; U18.N7@3100.31,1233.57 3100.45,1233.62 3100.45,1233.7 3116.22,1249.47 v1(3116.84,1249.47) 3116.84,1250.09 3131.81,1265.06 3131.95,1265.12 U18.P8@3131.89,1265.26 v1(3100.39,1296.75) U18.N9@3100.45,1296.62 ; U18.N5@3100.45,1170.63 3100.45,1170.73 3115.8,1186.09 v1(3116.59,1186.09) ; U18.N11@3100.45,1359.61 v1@3115.71,1374.86 ; U18.N13@3100.45,1422.6 3100.45,1422.11 3116,1406.56 v1(3116.2,1406.56) ; U18.N15@3100.45,1485.59 3100.59,1485.65 v1(3115.56,1500.62) ; U18.N5@3100.59,1170.69 U18.N5@3100.72,1170.74 ; v1(3116.2,1374.86) 3116.2,1375.36 3131.95,1391.1 U18.P12@3131.81,1391.05 ; v1(3131.89,1076.28) 3131.89,1076.1 U18.P2@3131.95,1076.05 ; v1(3131.89,1233.76) U18.P7@3131.95,1233.62 ; v1(3148.09,1123.68) U18.R4@3163.44,1139.04 ; v1(3148.69,1282.66) 3149.2,1282.66 3149.87,1283.33 3150.15,1283.33 3163.44,1296.62 U18.R9@3163.39,1296.75 ; U18.R11@3163.39,1359.74 3163.44,1359.61 3178.41,1374.58 3179.3,1374.58 v1(3179.58,1374.86) ; v1(3179.58,1186.68) U18.T6@3194.94,1202.03 ; U18.T1@3194.84,1044.65 3194.88,1044.69 v1(3194.88,1044.78) ; U18.T16@3194.94,1517.09 3195.07,1517.14 3209.29,1531.36 3209.29,1531.54 v1(3209.9,1532.15) ; R78.1@3198.82,1686.02 v1(3236.22,1686.02) ; v1(3226.38,1107.78) U18.U3@3226.43,1107.74 ; U18.U13@3226.57,1422.66 3226.43,1422.6 3242.18,1406.85 v1(3242.18,1406.1) ; v1(3242.18,1597.5) 3242.18,1596.71 3257.87,1581.01 U18.V18@3257.87,1580.22 ; v1@3242.58,1341.6 3256.06,1328.11 3257.93,1328.11 U18.V10@3257.79,1328.06 ; v1@3242.58,1341.64 3242.89,1341.95 3243.47,1341.95 3243.55,1342.03 v1(3245.83,1342.03) ; v1(3257.87,1044.78) 3257.87,1044.7 U18.V1@3257.93,1044.65 ; v1(3350.95,1685.54) 3350.95,1685.24 Y2.2@3351.15,1685.04 ; v1(3436.02,2373.03) R52.1@3440.94,2377.95 ; C67.2@3436.42,2179.13 3437.01,2179.13 3455.71,2160.43 v1(3457.68,2160.43) v1@3455.12,2160.43 ; v1(3443.28,1686.92) 3443.28,1685.83 C130.2@3443.67,1685.43 ; U15.4@3531.69,3193.9 3531.69,3158.46 R104.1@3543.5,3146.65 R105.1@3543.5,3107.28 ; v1(2683.78,2168.31) U6.49@2693.62,2178.15 ; v1(2683.78,2168.31) U6.49@2693.62,2178.15 ; U18.F6@2879.98,1202.13 v1@2895.73,1217.88 ; U18.J13@2974.47,1422.6 2974.47,1423.09 v1(2990.21,1438.84) 3005.33,1453.96 U18.K14@3006.02,1453.96
  F.Cu w20: J3.1@3644.09,3551.77 J3.2@3644.09,3601.77 J3.6@3744.09,3601.77 ; J3.5@3744.09,3551.77 J3.6@3744.09,3601.77 ; J3.9@3844.09,3551.77 J3.10@3844.09,3601.77 J3.6@3744.09,3601.77
  F.Cu w27.5: C1022_4_CH4.1@891,1005.74 v1(891.09,1005.65) C1022_4_CH4.1@891.44,1006
  In1.Cu (GND) w20: J3.1@3644.09,3551.77 J3.2@3644.09,3601.77 J3.6@3744.09,3601.77 ; J3.5@3744.09,3551.77 J3.6@3744.09,3601.77 ; J3.9@3844.09,3551.77 J3.10@3844.09,3601.77 J3.6@3744.09,3601.77
  In3.Cu (Sign) w20: J3.1@3644.09,3551.77 J3.2@3644.09,3601.77 J3.6@3744.09,3601.77 ; J3.5@3744.09,3551.77 J3.6@3744.09,3601.77 ; J3.9@3844.09,3551.77 J3.10@3844.09,3601.77 J3.8@3794.09,3601.77 J3.6@3744.09,3601.77
  In4.Cu (GND) w20: J3.1@3644.09,3551.77 J3.2@3644.09,3601.77 J3.6@3744.09,3601.77 ; J3.5@3744.09,3551.77 J3.6@3744.09,3601.77 ; J3.9@3844.09,3553.33 J3.9@3844.09,3551.77 J3.10@3844.09,3601.77 J3.6@3744.09,3601.77
  B.Cu w10: v1(1889.76,483.86) 1897.36,491.46 1898.21,491.46 1916.22,509.47 U11.7@1950.54,509.47 ; C77.1@2276.97,1975.39 2276.97,1937.6 R86.2@2277.56,1937.01 ; v1(2432.09,1848.43) 2434.65,1845.87 C129.1@2434.65,1819.69 ; U10.7@3263.78,635.33 v1(3263.78,685.04) ; v1(3481.3,3253.94) R111.2@3481.3,3279.53
  B.Cu w20: J3.1@3644.09,3551.77 3644.09,3591.86 J3.2@3649.62,3597.39 ; J3.2@3644.09,3601.77 J3.6@3744.09,3601.77 ; J3.5@3744.09,3551.77 J3.6@3744.09,3601.77 ; J3.9@3844.09,3553.33 J3.9@3844.09,3551.77 J3.10@3844.09,3601.77 J3.6@3744.09,3601.77